# Altium PCB ADS1299-V3.PcbDoc (part 3 of 3)
Units mm, origin at the board's own origin, x right, y up, seen from the top; angles counter-clockwise.
Board outline 93.01 x 69.99 mm, 4 copper layers (Top, GND, POWER, Bottom), stack 0.603 mm thick; 198 components, 137 nets, 685 pads, 384 vias.
Unrouted connection lines stored in the file: 1.
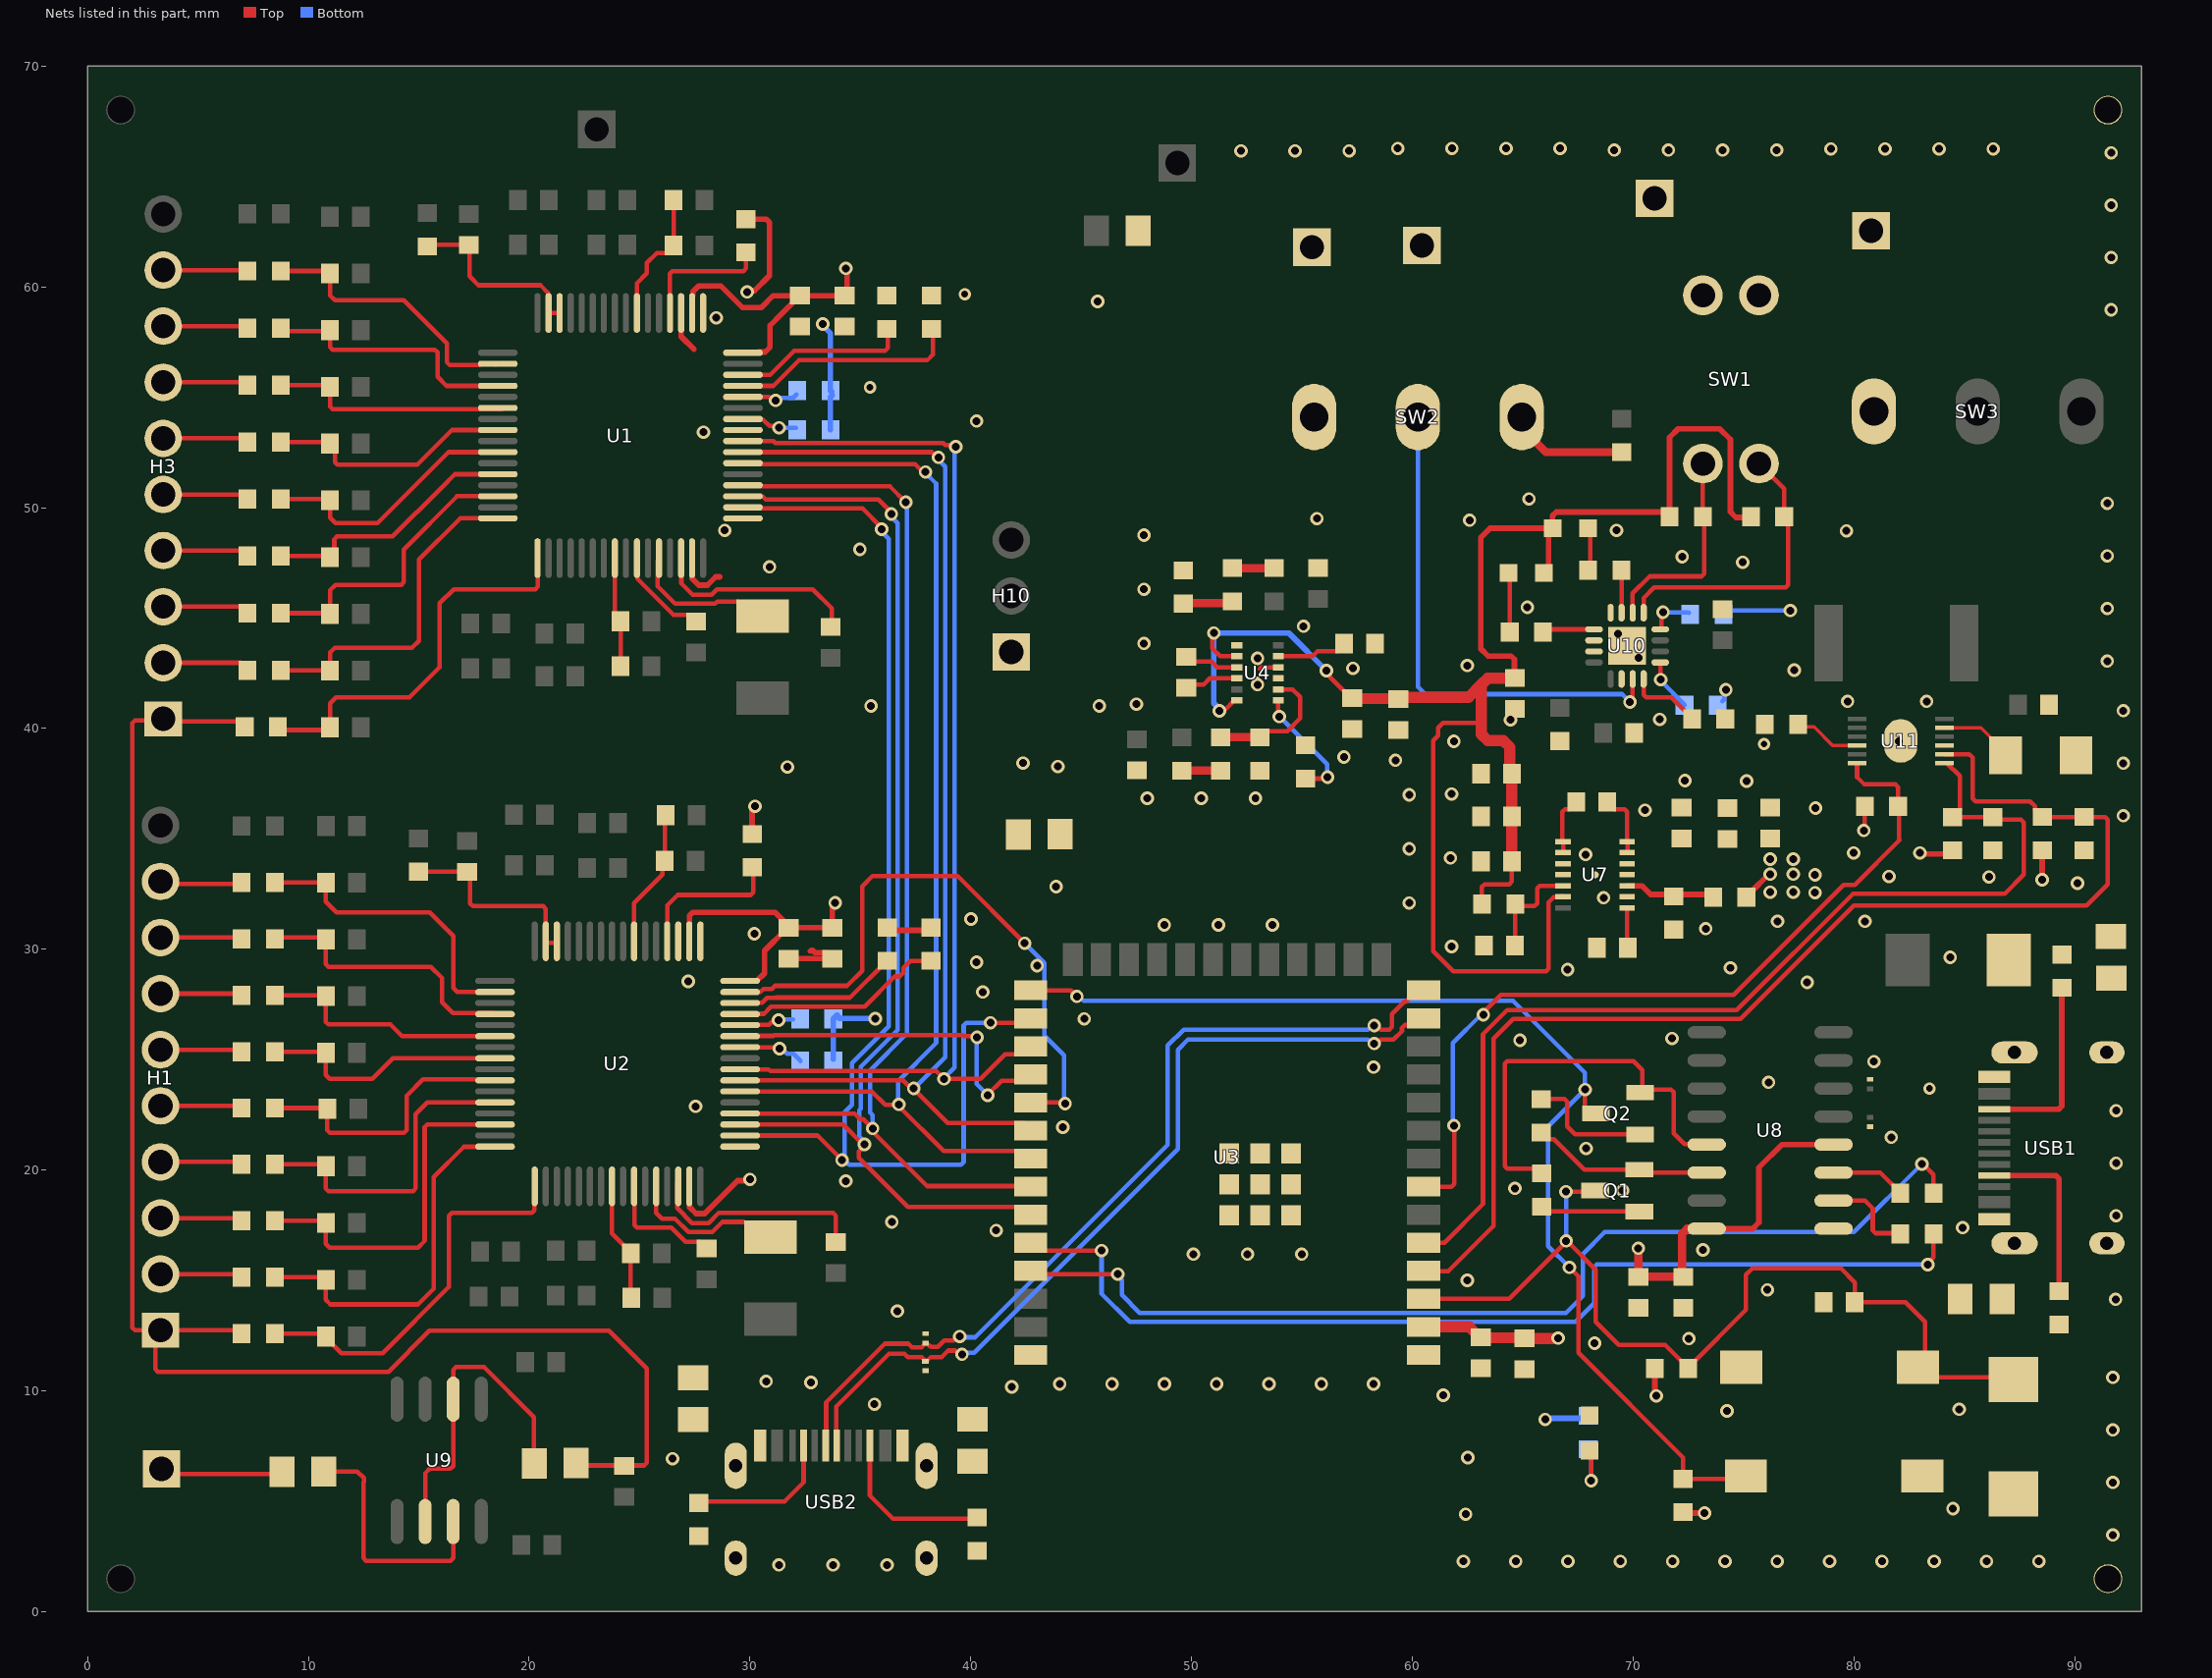
[diagram p4: the nets of this part, all layers, seen from the top]

## Via types
v1: diameter 0.61, hole 0.356, Top to Bottom, tented both sides, 357 vias
v2: diameter 0.61, hole 0.356, Top to Bottom, 22 vias
v3: diameter 0.559, hole 0.305, Top to Bottom, 4 vias
v4: diameter 1.016, hole 0.508, Top to Bottom, tented both sides, 1 vias

## Nets (pads, with @x,y where several pads share a name; then routed paths per layer and width w, separated by ;. In a path a pad name is that pad's centre, name@x,y a point inside that pad or via, vN(x,y) a via of type N, cw(c..) or ccw(c..) an arc to the next point about the centre after c; other vN are vias at no path point) (continued)
DGND: BOOT1.2 C14.2 C15.2 C66.2 C67.2 C73.2 C74.2 C75.1 C76.1 C77.2 C94.2 C95.2 D2.1 D3.1 D4.1 D6.1 D7.1 EN1.2 H10.1 LED1.1 pad.2@91.5,1.5 R3.2 R4.2 R5.2 R6.2 R8.1 R9.1 R10.2 R12.2 R13.2 R19.2 R57.2 R59.2 R60.1 R66.2 R67.2 R70.2 R71.2 U1.31 U1.33 U1.41 U1.49 U1.51 U2.31 U2.33 U2.49 U2.51 U3.1 U3.40 U3.41 U8.1 U11.3 U11.13 | length 27.5
  Top w0.254: U1.51@26.88,58.814 26.885,58.809 26.885,57.748 27.457,57.175 ; U2.31@27.253,19.266 27.258,19.261 27.258,18.336 27.558,18.036 27.948,18.036 29.437,19.525 29.939,19.525 v1(29.997,19.583) ; U1.31@27.38,47.714 27.385,47.709 27.385,46.784 27.685,46.484 28.075,46.484 28.454,46.863 28.626,46.863 ; R9.1@29.82,63.06 30.738,63.06 30.886,62.911 30.886,60.503 30.208,59.825 29.929,59.825 v1(29.87,59.766) ; C14.2@31.75,29.577 33.517,29.577 C15.2@33.604,29.489 ; 32.741,29.921 32.784,29.964 32.831,29.964 32.945,29.85 33.458,29.85 C15.2@33.731,29.577 ; R3.2@36.221,30.984 36.344,30.861 R4.2@38.1,30.861
  Bottom w0.254: v1@33.172,58.344 33.192,58.344 33.646,57.889 R13.2@33.646,55.296 R13.2@33.697,55.245 ; R19.2@33.646,53.518 33.646,55.008 R13.2@33.731,55.093 ; R6.2@33.773,25.028 R5.2@33.773,26.848 33.951,27.026 33.951,27.002 34.05,26.904 34.05,26.866 35.67,26.866 v1(35.678,26.858)
  other v1: 62.306,2.286 64.675,2.286 67.044,2.286 69.414,2.286 71.783,2.286 74.152,2.286 76.521,2.286 78.89,2.286 81.259,2.286 83.628,2.286 85.997,2.286 88.367,2.286 91.719,3.48 62.408,4.42 84.48,4.674 91.719,5.859 62.509,6.985 91.719,8.238 74.244,9.093 84.76,9.169 35.636,9.398 61.392,9.804 41.859,10.185 44.027,10.32 46.396,10.32 48.765,10.32 51.134,10.32 53.503,10.32 55.873,10.32 58.242,10.32 30.734,10.439 91.719,10.617 68.25,12.167 72.517,12.37 36.678,13.614 76.073,14.58 62.484,15.011 50.079,16.197 52.531,16.197 54.983,16.197 73.152,16.383 41.148,17.272 84.912,17.399 36.424,17.653 69.52,19.075 64.643,19.177 34.341,19.507 67.869,20.98 81.686,21.488 44.171,21.946 76.124,23.978 58.242,24.663 80.899,24.917 64.872,25.883 71.755,25.959 45.136,26.848 77.876,28.499 27.203,28.55 84.353,29.642 30.201,30.709 80.493,31.267 40.005,31.369 90.119,32.995 86.106,33.274 81.585,33.299 79.985,34.366 92.195,36.046 31.693,38.253 42.367,38.43 92.195,38.425 82.017,39.421 92.195,40.804 35.484,41.021 45.822,41.021 79.705,41.224 83.287,41.224 28.854,48.971 27.889,53.416 33.299,58.318 28.473,58.598 45.745,59.334
  other v2: 32.766,10.389 27.534,22.885 40.538,28.067 40.259,29.413 30.886,47.32 34.976,48.108 40.259,53.924
  other v3: 83.414,23.698 75.921,39.294 35.433,55.448 39.726,59.665
DRDY: U2.47 U3.31 | length 28.2
  Top w0.203: U2.47@29.553,28.066 29.568,28.08 30.482,28.08 30.613,28.211 30.989,28.211 31.124,28.346 34.392,28.346 35.077,29.032 35.077,32.842 35.56,33.325 39.395,33.325 v1(42.443,30.277) ; U3.31@42.709,23.062 44.222,23.062 v1(44.272,23.012)
  Bottom w0.203: v1(42.443,30.277) 43.332,29.388 43.332,26.086 44.221,25.197 44.221,23.063 v1(44.272,23.012)
  other v1: 43.002,29.261
DTR: Q2.2 R28.1 U8.13 | length 19.1
  Top w0.203: R28.1@65.862,19.854 65.65,20.066 64.305,20.066 64.186,20.185 64.186,24.824 64.305,24.943 70.002,24.943 70.409,24.536 Q2.2@70.409,23.368 ; Q2.2@70.46,23.622 70.485,23.647 71.712,23.647 71.831,23.528 71.831,21.666 72.327,21.171 73.315,21.171 U8.13@73.328,21.158
DVDD: C14.1 C15.1 C58.1 C59.1 C66.1 C67.1 C68.1 C73.1 C74.1 C75.2 C76.2 H8.1 R2.1 R16.2 R20.2 R30.1 R33.1 R55.1 R56.1 R58.1 U1.48 U1.50 U2.48 U2.50 U3.2 U7.4 U7.5 U8.4 U8.16 | length 57.2
  Top w0.203: v1@80.366,35.433 80.484,35.552 R58.1@80.484,36.474
  Top w0.254: U2.50@27.253,30.366 27.258,30.371 27.258,31.525 27.407,31.674 31.14,31.674 C14.1@31.521,31.293 ; U1.50@27.38,58.814 27.38,59.581 27.41,59.611 27.41,59.768 27.685,60.044 28.678,60.044 29.667,59.055 30.504,59.055 31.048,59.599 C66.1@32.258,59.599 34.022,59.599 C67.1@34.036,59.613 ; U2.48@29.553,28.566 30.306,28.566 30.658,28.918 30.658,29.935 C14.1@31.584,30.861 ; R2.1@30.099,35.221 30.099,36.346 v1@30.132,36.379 ; U1.48@30.389,57.047 30.689,57.047 30.912,57.271 30.912,58.253 31.414,58.755 31.414,58.762 31.645,58.992 31.652,58.992 31.999,59.339 31.999,59.389 C66.1@32.208,59.599 ; C14.1@31.75,30.977 C15.1@33.471,30.977 ; C15.1@33.731,30.977 33.731,32.004 v1@33.807,32.08 ; C67.1@34.281,59.599 34.392,59.709 v1@34.392,60.833 ; C76.2@70.18,15.218 C76.2@70.231,15.167 ; R33.1@70.976,11.024 70.976,9.872 v1@70.993,9.855 ; R30.1@72.263,4.513 72.306,4.47 v1(73.228,4.47) ; U8.16@73.076,17.399 73.127,17.348 U8.16@73.328,17.348 75.413,17.348 75.692,17.628 75.692,20.117 76.733,21.158 U8.4@79.072,21.158 ; R16.2@75.184,32.563 75.299,32.563 76.137,33.401 v1(76.2,33.401) ; v1@83.058,34.315 84.294,34.315 R56.1@84.455,34.476 ; v1(88.519,33.147) R55.1@88.519,34.485
  Top w0.381: C15.1@33.471,30.977 33.477,30.971 C15.1@33.477,30.963 ; C76.2@70.18,15.218 70.231,15.268 v1(70.231,16.459) ; C76.2@70.231,15.167 C75.2@72.263,15.167 ; C75.2@72.218,15.336 72.218,17.125 72.441,17.348 U8.16@73.076,17.348
  Top w0.508: U3.2@60.509,12.902 62.576,12.902 63.056,12.422 C73.1@63.106,12.422 ; C73.1@63.094,12.435 63.119,12.409 C74.1@65.075,12.409 ; C74.1@65.075,12.384 66.588,12.384 v1(66.599,12.395)
  Bottom w0.254: v1@66.116,8.763 67.868,8.763 R20.2@67.974,8.869
  other v1: 66.015,8.712 71.044,9.779 33.858,32.106 78.232,32.563 76.2,32.588 77.241,32.588 78.232,33.376 77.241,33.401 76.2,34.087 77.241,34.087 82.982,34.366 80.442,35.382 30.226,36.474 34.341,60.833
EEG1P: H1.2 R15.1 | length 3.7
  Top w0.203: H1.2@3.302,15.291 6.807,15.291 R15.1@6.96,15.138
EEG2P: H1.3 R18.1 | length 3.6
  Top w0.203: H1.3@3.302,17.831 6.756,17.831 R18.1@6.833,17.755
EEG3P: H1.4 R21.1 | length 3.6
  Top w0.203: H1.4@3.302,20.371 6.756,20.371 R21.1@6.858,20.269
EEG4P: H1.5 R22.1 | length 4.1
  Top w0.203: H1.5@3.302,22.911 6.833,22.911 R22.1@7.214,22.53
EEG5P: H1.6 R23.1 | length 3.7
  Top w0.203: H1.6@3.302,25.451 6.731,25.451 R23.1@6.909,25.273
EEG6P: H1.7 R24.1 | length 3.8
  Top w0.203: H1.7@3.302,27.991 6.909,27.991 R24.1@7.061,27.838
EEG7P: H1.8 R25.1 | length 3.8
  Top w0.203: H1.8@3.302,30.531 6.96,30.531 R25.1@7.061,30.429
EEG8P: H1.9 R34.1 | length 3.9
  Top w0.203: H1.9@3.302,33.071 3.404,32.969 6.68,32.969 7.036,33.325 R34.1@7.036,33.35
EEG9P: H3.2 R38.1 | length 4
  Top w0.203: H3.2@3.429,42.977 6.938,42.977 7.116,42.799 R38.1@7.315,42.799
EEG10P: H3.3 R39.1 | length 4
  Top w0.203: H3.3@3.429,45.517 7.214,45.517 R39.1@7.391,45.339
EEG11P: H3.4 R40.1 | length 3.9
  Top w0.203: H3.4@3.429,48.057 7.137,48.057 R40.1@7.29,47.904
EEG12P: H3.5 R41.1 | length 3.7
  Top w0.203: H3.5@3.429,50.597 6.946,50.597 7.036,50.507 R41.1@7.036,50.419
EEG13P: H3.6 R42.1 | length 3.8
  Top w0.203: H3.6@3.429,53.137 7.112,53.137 R42.1@7.214,53.035
EEG14P: H3.7 R43.1 | length 4.1
  Top w0.203: H3.7@3.429,55.677 7.087,55.677 R43.1@7.366,55.397
EEG15P: H3.8 R44.1 | length 4.1
  Top w0.203: H3.8@3.429,58.217 7.341,58.217 R44.1@7.468,58.09
EEG16P: H3.9 R45.1 | length 4.1
  Top w0.203: H3.9@3.429,60.757 7.315,60.757 R45.1@7.442,60.63
EN: C77.1 D4.2 EN1.1 Q1.3 R33.2 U3.3 | length 42
  Top w0.203: U3.3@60.509,14.172 64.388,14.172 66.963,16.748 v1(66.963,16.793) ; v1(66.954,19.025) 68.224,19.025 Q1.3@68.275,19.075 ; v1@67.005,16.789 68.301,15.494 68.301,13.132 69.342,12.09 71.445,12.09 72.334,11.201 R33.2@72.593,11.201 ; R33.2@72.483,11.024 72.483,11.052 72.613,11.182 75.108,13.677 75.108,15.265 75.387,15.545 79.408,15.545 80.043,14.911 C77.1@80.043,14.039 ; C77.1@80.024,14.021 82.321,14.021 83.21,13.132 83.21,10.998 EN1.1@83.185,10.973 ; EN1.1@82.892,11.074 83.35,10.617 D4.2@87.071,10.617
  Bottom w0.203: v1(66.954,19.025) 66.959,19.02 66.959,16.798 v1(66.963,16.793)
EN1: R47.2 SW1.4 U10.6 | length 9.7
  Top w0.203: U10.6@69.973,45.239 69.973,46.123 70.739,46.888 73.101,46.888 73.22,47.007 R47.2@73.22,49.497 ; R47.2@73.152,49.581 SW1.4@73.152,51.994 73.152,52.146 SW1.4@73.228,52.222
EN2: R46.2 SW1.3 U10.5 | length 13.6
  Top w0.203: U10.5@70.473,45.239 70.473,45.911 70.942,46.38 76.894,46.38 77.013,46.499 77.013,49.606 R46.2@76.937,49.682 ; SW1.3@75.641,51.968 75.717,51.968 76.835,50.851 R46.2@76.835,49.581
GND: C35.1 C37.2 C38.1 C39.1 C40.1 C55.2 C56.1 C57.1 C58.2 C59.2 C68.2 C79.1 C91.1 C92.1 C93.1 C97.1 H2.1 H5.1 pad.2@91.5,68 R8.2 R11.2 R48.1 R50.2 R51.2 R52.1 R62.1 R73.2 R74.1 R75.2 SW1.1 SW1.2 SW2.3 U4.4 U4.13 U7.2 U7.15 U10.8 U10.14 U10.17 | length 4.6
  Top w0.203: 53.086,42.697 53.158,42.77 U4.4@53.924,42.77
  Bottom w0.203: R50.2@74.041,41.224 74.131,41.314 74.131,41.695 v1(74.193,41.758) ; R51.2@74.083,45.161 74.261,45.339 77.064,45.339 v1@77.089,45.314
  other v1: 67.031,29.083 74.397,29.159 61.773,30.124 73.279,30.937 48.759,31.107 51.21,31.107 53.662,31.107 76.53,31.267 59.851,32.096 68.656,32.334 43.866,32.842 61.722,34.138 67.843,34.29 59.851,34.548 70.536,36.297 78.257,36.398 47.989,36.838 50.44,36.838 52.892,36.838 59.851,37 61.773,37.033 72.339,37.643 43.942,38.278 61.874,39.421 64.44,40.386 71.196,40.411 47.498,41.097 52.984,41.986 77.292,42.647 57.302,42.723 62.484,42.85 91.465,43.053 52.984,43.18 70.238,43.187 47.845,43.848 69.317,44.298 55.067,44.628 77.114,45.339 91.465,45.432 65.202,45.491 47.845,46.3 74.955,47.523 72.212,47.777 91.465,47.811 47.845,48.752 79.654,48.946 69.24,48.971 62.586,49.428 55.677,49.505 91.465,50.19 65.278,50.394 91.643,58.958 91.643,61.327 91.643,63.696 91.643,66.065 52.233,66.152 54.685,66.152 57.136,66.152 69.142,66.192 71.594,66.192 74.045,66.192 76.497,66.192 78.949,66.243 81.401,66.243 83.853,66.243 86.305,66.243 59.334,66.269 61.786,66.269 64.238,66.269 66.69,66.269
  other v2: 75.133,37.617 59.233,38.557 56.896,38.71
GPIO0: BOOT1.1 Q2.3 R30.2 U3.27 | length 51.9
  Top w0.203: U3.27@42.709,28.142 44.527,28.142 v1@44.729,27.94 ; v1(67.107,15.596) 67.513,15.189 67.513,11.735 72.263,6.985 R30.2@72.263,6.02 74.524,6.02 BOOT1.1@74.752,6.248 ; v1(67.818,23.647) 67.818,22.814 68,22.631 Q2.3@68.021,22.631
  Bottom w0.203: v1(44.806,27.864) 44.916,27.864 45.119,27.661 64.567,27.661 67.818,24.409 67.818,23.551 67.722,23.551 66.142,21.971 66.142,16.561 v1(67.107,15.596)
GPIOT: R58.2 U3.7 U11.12 | length 36.9
  Top w0.203: U3.7@60.509,19.252 61.772,19.252 61.891,19.371 61.891,21.911 v1@61.976,21.996 ; v1(63.209,27.038) 63.209,27.141 64.008,27.94 74.552,27.94 79.526,32.914 80.031,32.914 82.067,34.95 ; U11.12@80.137,38.437 80.137,37.795 80.467,37.465 81.872,37.465 81.991,37.346 R58.2@81.991,36.474 82.042,36.424 82.042,34.976
  Bottom w0.203: v1@61.824,22.149 61.824,25.756 63.106,27.038 v1(63.209,27.038)
  other v1: 61.874,22.022
IN1P: C24.1 R15.2 U2.16 | length 17
  Top w0.203: R15.2@8.489,15.15 10.631,15.15 C24.1@10.643,15.138 ; C24.1@10.792,15.037 10.792,14.125 10.998,13.919 14.961,13.919 15.672,14.63 15.672,19.685 17.043,21.057 18.694,21.057 U2.16@18.72,21.082
IN2P: C25.1 R18.2 U2.14 | length 16.3
  Top w0.203: R18.2@8.489,17.704 C25.1@10.744,17.704 ; C25.1@10.792,17.605 10.792,16.665 10.973,16.485 14.961,16.485 15.265,16.789 15.265,21.947 15.384,22.066 U2.14@18.453,22.066
IN3P: C26.1 R21.2 U2.12 | length 14.5
  Top w0.203: R21.2@8.489,20.258 10.403,20.258 C26.1@10.58,20.435 ; C26.1@10.792,20.173 10.792,19.169 10.911,19.05 14.74,19.05 14.859,19.169 14.859,22.538 15.387,23.066 U2.12@18.453,23.066
IN4P: C27.1 R22.2 U2.10 | length 12.8
  Top w0.203: R22.2@8.489,22.812 10.691,22.812 C27.1@10.719,22.784 ; C27.1@10.857,22.784 10.857,21.811 10.976,21.692 14.334,21.692 14.453,21.811 14.453,23.368 15.189,24.105 U2.10@18.517,24.105
IN5P: C30.1 R23.2 U2.8 | length 11.2
  Top w0.203: R23.2@8.489,25.366 10.549,25.366 C30.1@10.668,25.248 ; C30.1@10.792,25.31 10.792,24.311 10.973,24.13 12.903,24.13 13.839,25.066 U2.8@18.343,25.066
IN6P: C31.1 R24.2 U2.6 | length 11.4
  Top w0.203: R24.2@8.489,27.92 C31.1@10.792,27.92 ; C31.1@10.792,27.878 10.792,26.713 10.911,26.594 13.716,26.594 14.244,26.066 U2.6@18.453,26.066
IN7P: C32.1 R25.2 U2.4 | length 12.3
  Top w0.203: R25.2@8.489,30.474 8.545,30.531 C32.1@10.439,30.531 ; C32.1@10.792,30.446 10.792,29.329 10.911,29.21 15.545,29.21 16.053,28.702 16.053,27.61 16.542,27.121 U2.4@18.44,27.121
IN8P: C33.1 R34.2 U2.2 | length 14
  Top w0.203: R34.2@8.489,33.029 10.651,33.029 C33.1@10.715,33.092 ; C33.1@10.795,33.122 10.795,32.156 11.278,31.674 15.494,31.674 16.561,30.607 16.561,28.245 16.74,28.066 U2.2@18.453,28.066
IN9P: C83.1 R38.2 U1.16 | length 15.2
  Top w0.203: R38.2@8.754,42.638 C83.1@10.837,42.638 ; C83.1@10.984,42.624 10.984,43.445 11.201,43.663 14.707,43.663 15.011,43.967 15.011,47.65 16.875,49.514 U1.16@18.58,49.514
IN10P: C84.1 R39.2 U1.14 | length 13.4
  Top w0.203: R39.2@8.754,45.22 C84.1@10.905,45.22 ; C84.1@10.984,45.192 10.984,46.264 11.227,46.507 14.207,46.507 14.326,46.626 14.326,48.108 16.732,50.514 U1.14@18.51,50.514
IN11P: C85.1 R40.2 U1.12 | length 11.7
  Top w0.203: R40.2@8.754,47.803 C85.1@10.947,47.803 ; C85.1@10.984,47.76 11.176,47.953 11.176,48.573 11.295,48.692 13.818,48.692 16.027,50.902 16.64,51.514 U1.12@18.58,51.514
IN12P: C86.1 R41.2 U1.10 | length 12
  Top w0.203: R41.2@8.754,50.385 C86.1@10.964,50.385 ; C86.1@10.984,50.329 10.984,49.541 11.224,49.301 13.132,49.301 16.344,52.514 U1.10@18.58,52.514
IN13P: C87.1 R42.2 U1.8 | length 11.2
  Top w0.203: R42.2@8.754,52.967 C87.1@10.88,52.967 ; C87.1@10.984,52.897 11.201,52.679 11.201,52.062 11.32,51.943 14.935,51.943 16.506,53.514 U1.8@18.58,53.514 18.622,53.514 U1.8@18.644,53.492
IN14P: C88.1 R43.2 U1.6 | length 10.9
  Top w0.203: R43.2@8.754,55.55 C88.1@10.897,55.55 ; C88.1@10.984,55.465 10.984,54.578 11.103,54.459 U1.6@18.771,54.459
IN15P: C89.1 R44.2 U1.4 | length 11.7
  Top w0.203: R44.2@8.754,58.132 8.898,57.988 C89.1@10.947,57.988 ; C89.1@10.984,58.033 10.984,57.269 11.103,57.15 15.731,57.15 15.85,57.031 15.85,55.923 16.259,55.514 18.303,55.514 U1.4@18.313,55.524
IN16P: C90.1 R45.2 U1.2 | length 12.5
  Top w0.203: R45.2@8.754,60.714 C90.1@10.964,60.714 ; C90.1@10.984,60.602 10.984,59.603 11.201,59.385 14.326,59.385 16.281,57.429 16.281,56.583 16.4,56.464 17.75,56.464 17.785,56.499 18.47,56.499 U1.2@18.491,56.478
NetC1_2: C1.2 R7.2 U1.62 U1.63 | length 8.4
  Top w0.203: R7.2@15.545,61.874 15.567,61.897 C1.2@17.272,61.897 ; C1.2@17.196,61.798 17.297,61.697 17.297,60.477 17.704,60.071 20.512,60.071 20.865,59.717 20.865,58.828 U1.63@20.88,58.814 ; U1.63@20.892,58.814 U1.62@21.38,58.814
NetC3_2: C3.2 R1.2 U2.62 U2.63 | length 9.4
  Top w0.203: R1.2@14.884,33.452 14.946,33.514 C3.2@17.194,33.514 ; C3.2@17.113,33.433 17.331,33.215 17.331,32.072 17.45,31.953 20.634,31.953 20.753,31.834 U2.63@20.753,30.366 20.753,30.338 20.789,30.302 U2.62@21.285,30.302
NetC10_1: C10.1 C11.1 U2.55 | length 6.2
  Top w0.203: U2.55@24.753,30.366 24.753,32.094 26.034,33.375 26.034,33.73 C10.1@26.103,33.799 ; C10.1@26.148,34.011 26.148,36.105 C11.1@26.213,36.17
NetC16_2: C16.2 C78.2 U2.24 | length 5.4
  Top w0.203: U2.24@23.753,19.266 23.753,17.126 24.598,16.281 24.598,14.249 C78.2@24.624,14.224 ; U2.24@23.753,19.435 U2.24@23.774,19.456
NetC17_2: C17.2 C69.2 U1.24 | length 5
  Top w0.203: U1.24@23.88,47.714 23.88,44.929 C69.2@23.952,44.856 ; C69.2@24.079,44.882 24.141,44.82 C17.2@24.141,42.824
NetC18_2: C18.2 U2.26 | length 5.5
  Top w0.203: U2.26@24.765,19.253 24.768,19.25 24.768,17.515 24.887,17.396 26.437,17.396 27.087,16.746 27.743,16.746 C18.2@28.042,16.448
NetC19_1: C19.1 U2.28 | length 7.3
  Top w0.203: U2.28@25.756,19.329 25.756,18.059 26.012,17.803 26.606,17.803 27.211,17.198 28.295,17.198 28.752,17.655 29.732,17.655 29.761,17.625 30.286,17.625 C19.1@30.937,16.974
NetC20_2: C20.2 U2.30 | length 10.1
  Top w0.203: U2.30@26.698,19.482 26.698,18.286 27.379,17.604 28.127,17.604 28.584,18.061 33.765,18.061 33.884,17.942 C20.2@33.884,16.739
NetC36_1: C36.1 U4.9 | length 2.5
  Top w0.203: C36.1@49.733,43.307 50.013,43.028 50.902,43.028 51.16,42.77 U4.9@52.045,42.77
NetC36_2: C36.2 U4.10 | length 2.4
  Top w0.203: C36.2@49.886,41.758 49.886,41.765 50.107,41.986 50.546,41.986 50.829,42.27 U4.10@52.045,42.27
NetC40_2: C40.2 U4.5 | length 3.2
  Top w0.203: U4.5@53.924,43.27 55.481,43.27 55.704,43.492 56.609,43.492 56.907,43.79 C40.2@56.907,43.84
NetC62_1: C62.1 C63.1 U1.55 | length 6
  Top w0.203: U1.55@24.88,58.814 24.88,60.161 25.331,60.612 25.331,61.075 25.782,61.526 26.239,61.526 C62.1@26.529,61.816 ; C62.1@26.529,61.874 26.543,61.889 C63.1@26.543,63.932
NetC70_2: C70.2 U1.26 | length 4.4
  Top w0.203: U1.26@24.88,47.714 24.895,47.699 24.895,46.784 26.535,45.144 27.211,45.144 27.356,44.998 C70.2@27.356,44.755
NetC71_1: C71.1 U1.28 | length 6.6
  Top w0.203: U1.28@25.825,47.6 25.825,46.429 26.608,45.646 28.422,45.646 28.519,45.743 29.495,45.743 30.147,45.091 C71.1@30.582,45.091
NetC72_2: C72.2 U1.30 | length 9.5
  Top w0.203: U1.30@26.88,47.714 26.895,47.699 26.895,46.562 27.405,46.052 28.254,46.052 28.506,46.304 32.842,46.304 33.706,45.441 33.706,44.577 C72.2@33.68,44.552
NetC79_2: C79.2 R14.2 U7.12 | length 4.7
  Top w0.203: R14.2@64.613,31.983 64.643,31.953 R14.2@64.66,31.953 ; C79.2@64.643,30.277 64.66,30.294 R14.2@64.66,31.953 ; R14.2@64.66,32.029 R14.2@64.66,32.055 ; U7.12@66.825,32.876 65.764,32.876 65.645,32.757 65.645,32.072 65.526,31.953 R14.2@64.66,31.953
NetC94_1: C94.1 U11.5 | length 3.6
  Top w0.152: U11.5@84.087,40.037 85.744,40.037 86.202,39.579 86.202,39.574 87.091,38.684 C94.1@87.097,38.684
NetC97_2: C97.2 U7.1 | length 1.9
  Top w0.203: U7.1@69.725,31.875 69.725,30.122 C97.2@69.799,30.048
NetH4_1: H4.1 SW3.1
NetL1_1: L1.1 U7.8 U7.9 | length 2.7
  Top w0.203: U7.9@66.825,34.376 U7.8@66.825,34.847 ; U7.8@66.825,34.852 66.825,34.862 66.788,34.899 66.788,36.228 66.907,36.347 67.124,36.347 67.423,36.646 L1.1@67.423,36.678
NetL1_2: L1.2 U7.6 U7.7 | length 3
  Top w0.203: L1.2@68.823,36.678 68.823,36.646 69.121,36.347 69.606,36.347 69.725,36.228 U7.7@69.725,34.876 69.727,34.876 69.75,34.852 69.75,34.399 69.749,34.399 U7.6@69.725,34.376
NetLED1_2: LED1.2 R20.1 | length 2.9
  Top w0.203: LED1.2@68.025,7.303 68.097,7.23 v1(68.097,5.944)
  Bottom w0.203: R20.1@68.047,7.417 68.097,7.366 v1(68.097,5.944)
NetLED2_1: LED2.1 R53.2 | length 1.9
  Top w0.203: R53.2@67.954,47.168 68.047,47.261 LED2.1@68.047,49.047
NetLED3_1: LED3.1 R54.2 | length 2.7
  Top w0.203: LED3.1@64.237,47.041 64.406,46.871 R54.2@64.406,44.374
NetQ1_1: Q1.1 R28.2 | length 4.4
  Top w0.203: R28.2@66.04,18.39 66.04,18.278 66.193,18.125 Q1.1@70.275,18.125
NetQ2_1: Q2.1 R29.2 | length 6
  Top w0.203: R29.2@65.634,23.114 65.735,23.216 66.886,23.216 67.005,23.097 67.005,21.971 67.361,21.615 Q2.1@70.307,21.615
NetR2_2: R2.2 U2.52 | length 7.2
  Top w0.203: U2.52@26.253,30.366 26.253,31.993 26.721,32.461 30.031,32.461 30.15,32.58 R2.2@30.15,34.036
NetR3_1: R3.1 U2.46 | length 7.5
  Top w0.203: U2.46@29.553,27.566 29.568,27.581 30.557,27.581 30.781,27.805 31.157,27.805 31.166,27.813 34.528,27.813 36.192,29.478 R3.1@36.221,29.478
NetR4_1: R4.1 U2.45 | length 9.5
  Top w0.203: U2.45@29.779,27.066 29.794,27.08 30.631,27.08 30.949,27.398 31.326,27.398 31.334,27.407 35.196,27.407 36.559,28.77 36.779,28.77 36.958,28.948 36.958,29.168 37.267,29.478 R4.1@38.202,29.478
NetR5_1: R5.1 U2.44 | length 2.5
  Top w0.203: U2.44@29.553,26.566 29.568,26.581 30.521,26.581 30.526,26.585 30.866,26.585 30.992,26.711 31.215,26.711 v1(31.293,26.789)
  Bottom w0.203: v1(31.293,26.789) 31.327,26.822 R5.1@31.953,26.822
NetR6_1: R6.1 U2.42 | length 3
  Top w0.203: U2.42@29.553,25.566 29.568,25.551 31.294,25.551 v1(31.344,25.502)
  Bottom w0.203: v1(31.344,25.502) 31.454,25.502 31.682,25.273 31.965,25.273 32.283,24.955 R6.1@32.283,24.943
NetR9_2: R9.2 U1.52 | length 5.9
  Top w0.203: U1.52@26.391,59.004 26.365,59.03 26.365,59.825 26.365,60.591 26.484,60.71 29.701,60.71 29.82,60.829 R9.2@29.82,61.553
NetR10_1: R10.1 U1.46 | length 7.9
  Top w0.203: U1.46@29.68,56.014 30.919,56.014 32.004,57.099 36.119,57.099 36.246,57.226 36.246,57.963 R10.1@36.297,58.014
NetR12_1: R12.1 U1.45 | length 10.5
  Top w0.203: U1.45@29.68,55.514 31.054,55.514 32.212,56.672 38.029,56.672 38.278,56.921 38.278,57.912 R12.1@38.506,58.141
NetR13_1: R13.1 U1.44 | length 2.2
  Top w0.203: U1.44@29.68,55.014 30.869,55.014
  Bottom w0.203: v1(31.158,54.857) 31.268,54.857 31.377,54.965 31.953,54.965 R13.1@32.106,55.118
NetR16_1: R16.1 R62.2 U7.3 | length 3.8
  Top w0.254: U7.3@69.725,32.876 70.401,32.876 70.79,32.487 R62.2@71.78,32.487 ; R62.2@71.831,32.402 71.916,32.487 R16.1@73.355,32.487
NetR19_1: R19.1 U1.42 | length 2.6
  Top w0.203: U1.42@29.68,54.014 29.695,53.999 30.579,53.999 30.62,53.959 30.624,53.959 30.886,53.697 31.24,53.697 v1(31.318,53.619)
  Bottom w0.203: v1(31.318,53.619) R19.1@32.08,53.619
NetR26_1: R26.1 U8.3 | length 3.6
  Top w0.203: U8.3@79.072,19.888 81.182,19.888 82.118,18.952 R26.1@82.118,18.745
NetR27_1: R27.1 U8.2 | length 4.1
  Top w0.203: U8.2@79.072,18.618 80.493,18.618 80.848,18.263 80.848,17.264 80.967,17.145 81.864,17.145 R27.1@81.94,17.069
NetR31_1: R31.1 USB1.A5 | length 8.1
  Top w0.254: USB1.A5@86.353,19.756 89.132,19.756 89.281,19.607 R31.1@89.281,14.52
NetR32_1: R32.1 USB1.B5 | length 8.5
  Top w0.254: USB1.B5@86.353,22.756 89.259,22.756 89.408,22.905 R32.1@89.408,28.253
NetR36_1: R36.1 U9.3 | length 11.4
  Top w0.203: R36.1@10.703,6.35 12.217,6.35 12.514,6.053 12.514,5.885 12.497,5.867 12.497,2.43 12.616,2.311 16.442,2.311 16.561,2.43 U9.3@16.561,4.086
NetR37_2: R37.2 U9.2 U9.6 | length 14.8
  Top w0.203: U9.2@15.291,4.086 15.291,6.274 15.494,6.477 16.442,6.477 16.561,6.596 16.561,10.958 16.68,11.077 17.96,11.077 20.218,8.818 R37.2@20.218,6.629
NetR48_2: R48.2 U10.16 | length 3.3
  Top w0.203: U10.16@70.473,42.239 70.473,41.521 70.592,41.402 71.725,41.402 72.593,40.534 R48.2@72.593,40.488
NetR49_2: R49.2 SW2.1 | length 5.5
  Top w0.356: SW2.1@64.999,54.127 64.999,53.552 66.04,52.51 R49.2@69.469,52.51
NetR50_1: R50.1 U10.1 | length 2.4
  Top w0.203: U10.1@71.223,42.989 71.235,42.977 71.235,42.227 v1(71.247,42.215)
  Bottom w0.203: v1(71.247,42.215) 71.247,42.151 72.322,41.075 R50.1@72.322,41.046
NetR51_1: R51.1 U10.4 | length 2
  Top w0.203: U10.4@71.223,44.489 71.25,44.489 71.286,44.524 71.286,45.2 v1(71.349,45.263)
  Bottom w0.203: v1(71.349,45.263) 72.492,45.263 R51.1@72.517,45.237
NetR53_1: R53.1 U10.7 | length 2
  Top w0.203: R53.1@69.393,47.168 69.473,47.087 U10.7@69.473,45.239
NetR54_1: R54.1 U10.9 | length 2.4
  Top w0.203: R54.1@65.913,44.374 66.028,44.489 U10.9@68.223,44.489
NetR60_2: R60.2 U11.10 | length 3.2
  Top w0.152: R60.2@77.318,40.259 77.508,40.069 78.194,40.069 79.025,39.237 U11.10@80.137,39.237
NetR63_1: R63.1 R72.2 | length 1.8
  Top w0.381: R63.1@49.555,38.092 51.291,38.092 R72.2@51.359,38.024
NetR68_1: R68.1 USB2.A5 | length 6.7
  Top w0.203: R68.1@27.762,5.004 31.572,5.004 32.43,5.862 USB2.A5@32.43,7.525
NetR69_1: R69.1 USB2.B5 | length 7.5
  Top w0.203: USB2.B5@35.43,7.526 35.43,5.26 36.474,4.216 R69.1@40.259,4.216
NetR72_1: R72.1 R74.2 U4.2 | length 6
  Top w0.203: R74.2@53.061,39.573 R74.2@53.086,39.599 53.365,39.878 54.331,39.878 54.915,40.462 54.915,41.427 54.573,41.77 U4.2@53.924,41.77
  Top w0.381: R72.1@51.321,39.599 R74.2@52.984,39.599
NetR73_1: R73.1 U4.1 | length 5.4
  Top w0.203: U4.1@53.924,41.27 53.924,40.615 v1@53.95,40.589 ; R73.1@55.169,37.728 56.143,37.728 v1@56.185,37.77
  Bottom w0.203: v1(53.975,40.538) 56.134,38.379 56.134,37.744 v1@56.109,37.719
  other v1: 56.159,37.795
NetR75_1: R75.1 R76.2 U4.7 | length 2.3
  Top w0.381: R75.1@49.632,45.652 49.657,45.678 51.765,45.678 R76.2@51.841,45.754
NetR76_1: R76.1 R77.2 | length 1.8
  Top w0.381: R76.1@51.841,47.261 53.653,47.261 R77.2@53.679,47.235
NetSW2_2: SW2.2 U10.15 | length 24
  Top w0.203: U10.15@69.973,42.239 69.973,41.33 v1@70.053,41.25
  Bottom w0.203: SW2.2@60.528,54.839 60.249,54.559 SW2.2@60.249,54.102 60.249,41.885 60.579,41.554 69.494,41.554 v1(69.85,41.199)
OUT: C38.2 C39.2 C55.1 C56.2 C57.2 C93.2 LED2.2 LED3.2 R14.1 R46.1 R47.1 U4.3 U4.8 U4.12 U7.10 U7.11 U7.13 U10.10 U10.11 | length 85.3
  Top w0.203: v1(51.003,44.323) 50.935,44.255 50.935,43.849 50.927,43.84 50.927,43.637 51.295,43.27 U4.8@52.045,43.27 ; v1@51.525,40.86 51.934,41.27 U4.12@52.045,41.27 ; v1(56.109,42.621) 56.109,42.511 56.268,42.352 56.268,42.325 57.227,41.365 C38.2@57.277,41.365 ; 63.119,40.259 61.392,40.259 61.163,40.03 61.163,39.675 60.935,39.446 60.935,29.921 61.849,29.007 66.051,29.007 66.17,29.126 66.17,32.127 66.396,32.352 66.73,32.352 U7.13@66.777,32.399 ; R14.1@63.144,31.979 63.144,32.825 63.263,32.944 64.386,32.944 64.505,33.063 C57.2@64.505,33.985
  Top w0.254: C93.2@64.618,42.28 64.618,43.129 64.465,43.282 63.424,43.282 63.094,43.612 63.094,48.641 63.519,49.066 LED2.2@66.346,49.066 ; LED3.2@65.989,47.083 66.167,47.261 66.167,48.887 LED2.2@66.346,49.066 ; R47.1@71.526,49.759 71.482,49.803 66.514,49.803 66.346,49.635 LED2.2@66.346,49.066 ; R47.1@71.645,49.581 71.645,49.759 71.645,53.179 72.034,53.569 73.914,53.569 74.397,53.086 74.397,49.809 74.651,49.555 R46.1@75.362,49.555
  Top w0.508: C38.2@57.277,41.365 57.29,41.353 59.347,41.353 C39.2@59.36,41.34 59.436,41.416 62.553,41.416 63.119,41.982 ; C56.2@64.414,37.998 64.414,39.149 64.117,39.446 63.417,39.446 63.119,39.744 63.119,40.259 63.119,41.982 ; C57.2@64.505,34.047 C55.1@64.505,36.017 C56.2@64.505,37.948 ; C93.2@64.618,42.28 63.417,42.28 63.119,41.982
  Bottom w0.254: v1@51.283,40.863 51.003,41.143 v1(51.003,44.323) 54.407,44.323 v1(56.109,42.621)
  other v1: 51.257,40.792
PGND1: R68.2 R69.2 R70.1 R71.1 USB2.13 USB2.14 USB2.15 USB2.16 USB2.A1B12 USB2.B1A12
  other v1: 31.309,2.125 33.761,2.125 36.212,2.125
  other v2: 26.492,6.934
PGND2: D1.1 R31.2 R32.2 R66.1 R67.1 USB1.13 USB1.14 USB1.15 USB1.16 USB1.A1B12 USB1.B1A12
  other v1: 91.846,14.148 91.864,17.935 91.864,20.315 91.864,22.694
PWDR: U1.35 U2.35 U3.35 | length 52.5
  Top w0.203: U2.35@29.553,22.066 34.218,22.066 v1@35.182,21.102 ; U1.35@29.68,50.514 29.695,50.499 30.584,50.499 30.718,50.365 35.817,50.365 36.398,49.784 v1(36.398,49.708) ; v1(35.182,21.167) v1@35.182,21.102 ; U3.35@43.028,17.907 42.604,18.331 37.156,18.331 34.925,20.562 34.925,20.844 v1@35.182,21.102
  Bottom w0.203: v1(35.182,21.167) 35.182,21.277 34.947,21.512 34.947,22.709 35.027,22.788 35.027,24.679 36.694,26.346 36.694,49.302 36.398,49.598 v1(36.398,49.708)
REF: C81.2 H1.1 H3.1 R17.2 R37.1 R64.2 | length 70.7
  Top w0.203: H3.1@3.416,40.45 3.327,40.361 2.151,40.361 2.032,40.242 2.032,12.87 2.151,12.751 H1.1@3.073,12.751 ; H3.1@3.429,40.437 3.556,40.31 R64.2@7.01,40.31 ; R17.2@7.01,12.573 6.833,12.751 H1.1@3.302,12.751 H1.1@3.073,12.751 ; R37.1@22.133,6.731 22.234,6.629 24.308,6.629 25.205,6.629 25.324,6.748 25.324,11.024 23.622,12.725 15.481,12.725 13.627,10.871 3.192,10.871 3.073,10.99 H1.1@3.073,12.751
RESET: U1.36 U2.36 U3.34 | length 51.7
  Top w0.203: U2.36@29.553,22.566 34.737,22.566 34.983,22.32 35.125,22.32 v1(35.557,21.888) ; U1.36@29.68,51.014 30.461,51.014 30.516,50.959 36.341,50.959 v1(37.059,50.241) ; v1@35.486,21.817 35.535,21.768 38.024,19.279 U3.34@43.002,19.279
  Bottom w0.203: v1(35.557,21.888) 35.546,21.899 35.546,22.497 35.433,22.61 35.433,24.511 37.1,26.178 37.1,50.2 v1(37.059,50.241)
RTS: Q1.2 R29.1 U8.14 | length 8
  Top w0.203: R29.1@66.04,21.59 66.04,21.533 66.167,21.406 66.402,21.406 67.783,20.025 Q1.2@70.275,20.025 ; Q1.2@70.275,19.888 U8.14@73.328,19.888
RXD0: R27.2 U3.36 | length 46.5
  Top w0.203: U3.36@42.901,16.434 42.971,16.364 45.917,16.364 v1(45.923,16.358) ; v1@83.261,15.799 83.363,15.799 83.6,16.036 R27.2@83.6,17.12
  Bottom w0.203: v1(45.923,16.358) 45.923,14.402 47.193,13.132 67.386,13.132 68.224,13.97 68.224,15.604 68.343,15.723 v1(83.337,15.723)
SCL: R55.2 R59.1 U3.4 U11.2 | length 55.9
  Top w0.203: U3.4@60.452,15.418 61.62,15.418 63.678,17.475 63.678,25.959 64.567,26.848 74.854,26.848 79.985,31.979 90.526,31.979 91.491,32.944 91.491,35.873 91.372,35.992 R59.1@90.424,35.992 ; U11.2@84.087,38.837 85.217,38.837 85.369,38.684 85.369,36.83 85.508,36.691 87.98,36.691 88.189,36.482 88.189,36.293 88.439,36.043 R55.2@88.544,36.043 ; R55.2@88.519,35.992 R59.1@90.297,35.992
SDA: R56.2 R57.1 U3.5 U11.1 | length 46.7
  Top w0.203: U3.5@60.81,16.713 60.811,16.715 61.444,16.715 63.195,18.466 63.195,26.162 64.287,27.254 74.685,27.254 79.939,32.508 86.813,32.508 87.681,33.376 87.681,35.746 87.562,35.865 86.394,35.865 R57.1@86.275,35.983 ; U11.1@84.201,38.43 84.785,37.846 84.785,36.285 84.484,35.983 R56.2@84.455,35.983 R57.1@86.199,35.983
SPI_CLK: U1.40 U2.40 U3.29 | length 52.3
  Top w0.203: U2.40@29.553,24.566 30.842,24.566 30.923,24.486 38.43,24.486 v1(38.786,24.13) 40.437,24.13 41.561,25.254 42.323,25.254 U3.29@42.647,25.578 ; U1.40@29.68,53.014 31.062,53.014 31.155,52.92 38.747,52.92 38.834,52.834 39.191,52.834 v1@39.218,52.807
  Bottom w0.203: v1(38.786,24.13) 38.786,24.171 39.268,24.653 39.268,52.705 v1(39.319,52.756)
SPI_CS: U1.39 U2.39 U3.32 | length 52.5
  Top w0.203: U2.39@29.553,24.066 36.937,24.066 37.304,23.698 v1(37.414,23.698) 37.414,23.673 38.946,22.141 42.426,22.141 U3.32@42.85,21.717 ; U1.39@29.68,52.514 38.235,52.514 38.476,52.273 v1(38.532,52.273)
  Bottom w0.203: v1(37.414,23.698) 38.837,25.121 38.837,51.858 38.532,52.163 v1(38.532,52.273)
SPI_MISO: U2.43 U3.30 | length 15.6
  Top w0.203: U2.43@29.553,26.066 29.568,26.08 31.06,26.08 31.091,26.111 39.641,26.111 39.675,26.077 40.217,26.077 v1(40.284,26.01) ; v1(40.767,23.393) 40.767,23.424 41.397,24.054 42.131,24.054 U3.30@42.342,24.265
  Bottom w0.203: v1(40.284,26.01) 40.259,25.984 40.259,23.901 v1(40.767,23.393)
SPI_MOSI: U1.34 U2.34 U3.28 | length 56.4
  Top w0.203: U2.34@29.553,21.566 33.059,21.566 v1(34.17,20.454) ; U1.34@29.68,50.014 30.461,50.014 30.516,49.959 35.106,49.959 35.96,49.105 v1(35.96,49.023) ; v1(40.894,26.67) 42.342,26.67 U3.28@42.621,26.949
  Bottom w0.203: v1(35.96,49.023) 35.96,48.913 36.287,48.586 36.287,26.515 34.62,24.848 34.62,22.956 34.29,22.626 34.29,20.625 34.315,20.599 34.225,20.509 v1(34.17,20.454) 34.28,20.454 34.491,20.244 39.556,20.244 39.675,20.363 39.675,26.551 39.794,26.67 v1(40.894,26.67)
SRB: C23.2 R17.1 U2.17 | length 18
  Top w0.203: R17.1@8.489,12.596 C23.2@10.792,12.596 ; C23.2@10.792,12.469 10.792,12.419 11.497,11.714 13.371,11.714 16.375,14.718 16.375,17.94 16.494,18.059 20.119,18.059 20.238,18.178 U2.17@20.238,19.552
SRB1: H9.1 R36.2 | length 5.7
  Top w0.203: H9.1@3.353,6.477 3.581,6.248 R36.2@8.941,6.248
SRB2: C60.2 R64.1 U1.17 | length 17.8
  Top w0.203: R64.1@8.627,40.081 8.78,39.929 C60.2@10.922,39.929 ; C60.2@10.984,40.056 10.984,41.134 11.252,41.402 14.58,41.402 15.951,42.774 15.951,45.669 16.586,46.304 20.276,46.304 20.395,46.423 U1.17@20.395,47.471
START: U1.38 U2.38 U3.33 | length 52.3
  Top w0.203: U2.38@29.553,23.566 35.515,23.566 36.126,22.954 36.713,22.954 v1(36.738,22.979) 36.738,22.901 38.769,20.871 42.299,20.871 U3.33@42.57,20.599 ; U1.38@29.68,52.014 30.461,52.014 30.516,51.959 37.492,51.959 37.838,51.613 v1(37.948,51.613)
  Bottom w0.203: v1(36.738,22.979) 36.703,23.013 36.703,24.028 38.43,25.756 38.43,51.09 37.948,51.572 v1(37.948,51.613)
TXD0: R26.2 U3.37 | length 46.8
  Top w0.203: U3.37@42.977,15.24 43.028,15.291 v1(46.66,15.291) ; v1(83.07,20.278) 83.123,20.278 83.6,19.801 R26.2@83.6,18.948
  Bottom w0.203: v1(46.66,15.291) 46.66,15.195 46.838,15.017 46.838,14.351 47.65,13.538 66.954,13.538 67.716,14.3 67.716,16.205 68.707,17.196 79.988,17.196 v1(83.07,20.278)
USB_D+: D6.2 U3.14 USB2.A6 | length 39.8
  Top w0.203: USB2.A6@33.43,7.526 33.452,7.547 33.452,9.486 36.107,12.141 37.178,12.141 37.335,11.984 37.781,11.984 D6.2@37.9,12.103 ; D6.2@37.949,12.173 37.989,12.173 38.15,12.012 38.191,12.012 38.207,11.997 38.501,11.997 38.793,12.288 39.217,12.288 ; v1(58.268,26.543) 58.378,26.543 58.555,26.365 58.952,26.365 59.071,26.484 59.071,27.066 59.632,27.627 59.693,27.627 60.209,28.142 U3.14@60.509,28.142
  Bottom w0.203: v1(39.495,12.465) 39.528,12.431 40.206,12.431 48.92,21.145 48.92,25.64 49.645,26.365 57.98,26.365 58.158,26.543 v1(58.268,26.543)
USB_D-: D7.2 U3.13 USB2.A7 | length 38.9
  Top w0.203: USB2.A7@33.93,7.526 33.909,7.547 33.909,9.296 36.297,11.684 36.988,11.684 37.145,11.527 37.78,11.527 D7.2@37.899,11.408 ; D7.2@37.947,11.338 37.987,11.338 38.189,11.539 38.691,11.539 38.982,11.831 39.317,11.831 39.489,11.659 v1(39.599,11.659) ; v1(58.268,25.73) 58.378,25.73 58.555,25.908 59.141,25.908 59.528,26.295 59.528,26.449 59.647,26.569 60.205,26.569 U3.13@60.509,26.872
  Bottom w0.203: v1(39.599,11.659) 39.676,11.736 40.158,11.736 49.378,20.956 49.378,25.451 49.835,25.908 57.98,25.908 58.158,25.73 v1(58.268,25.73)
pads on no net: SW3.3 U1.1 U1.3 U1.5 U1.7 U1.9 U1.11 U1.13 U1.15 U1.18 U1.27 U1.29 U1.47 U1.64 U2.1 U2.3 U2.5 U2.7 U2.9 U2.11 U2.13 U2.15 U2.18 U2.27 U2.29 U2.64 U3.8 U3.9 U3.10 U3.11 U3.12 U3.15 U3.16 U3.17 U3.18 U3.19 U3.20 U3.21 U3.22 U3.23 U3.24 U3.25 U3.26 U3.38 U3.39 U7.14 U8.7 U8.8 U8.9 U8.10 U8.11 U8.12 U8.15 U9.1 U9.5 U9.8 U11.4 U11.9 U11.11 USB1.A8 USB1.B6 USB1.B7 USB1.B8 USB2.A4B9 USB2.A8 USB2.B4A9 USB2.B6 USB2.B7 USB2.B8
copper on no net:
  other v1: 52.409,17.952 53.809,17.952 51.709,18.652 53.109,18.652 54.509,18.652 52.409,19.352 53.809,19.352 51.709,20.052 53.109,20.052 54.509,20.052 52.409,20.752 53.809,20.752

## Polygon pours and split planes (outlines as drawn)
PGND2 on Top "PGND2_L01_P055" (solid, pour order 55): 93.218,29.54 90.475,29.54 89.713,30.302 89.713,31.344 85.598,31.344 85.522,31.267 85.522,23.089 87.427,23.089 87.351,23.012 87.351,19.025 85.496,19.025 85.471,18.999 85.471,12.167 93.166,12.167
GND on Top "GND_L01_P054" (solid, pour order 54): 92.558,41.58 92.558,67.462 46.425,67.462 46.425,40.513 43.688,40.513 42.926,39.751 42.951,39.726 42.951,32.334 45.062,30.223 60.302,30.223 60.302,30.076 60.3,30.074 61.697,28.677 64.592,28.677 64.618,28.651 74.778,28.651 79.273,33.147 79.273,37.846 78.384,38.735 75.032,38.735 74.828,38.938 75.057,39.167 75.057,41.58
AGND on Top "AGND_L01_P053" (solid, remove dead copper, pour order 53): 46.431,67.462 0.483,67.462 0.279,67.259 0.33,67.208 0.33,1.295 25.603,1.295 25.959,1.651 25.959,10.973 33.579,10.973 36.017,13.411 36.017,18.898 36.093,18.974 29.667,18.974 26.492,22.149 26.492,31.877 26.797,32.182 26.822,32.156 30.861,32.156 30.861,38.379 30.836,38.405 32.817,40.386 34.341,40.386 34.392,40.437 34.392,45.949 33.807,46.533 27.254,46.533 27.254,60.249 46.406,60.249 46.431,60.274
DGND on Top "DGND_L01_P051" (solid, remove dead copper, pour order 51): 92.583,41.58 92.685,29.558 92.658,29.531 92.649,29.54 90.475,29.54 89.687,30.328 89.687,31.318 85.598,31.318 85.522,31.242 85.522,23.089 87.325,23.089 87.351,23.063 87.351,19.05 85.471,19.05 85.446,19.025 85.471,18.999 85.471,12.192 92.685,12.192 92.71,12.167 92.634,12.09 92.634,1.321 41.453,1.321 41.173,1.6 41.173,7.722 38.633,7.722 38.659,7.747 38.659,8.56 35.738,8.56 35.763,8.534 35.763,6.553 31.699,6.553 31.572,6.68 31.547,6.68 31.547,9.246 25.933,9.246 25.933,11.024 33.68,11.024 36.043,13.386 36.043,18.974 29.642,18.974 26.492,22.123 26.492,31.877 26.772,32.156 30.836,32.156 30.836,38.381 32.816,40.361 34.392,40.361 34.392,45.949 33.807,46.533 27.254,46.533 27.254,60.249 46.457,60.249 46.457,40.513 43.688,40.513 42.951,39.776 42.951,32.334 45.057,30.229 60.316,30.229 60.316,30.057 61.747,28.626 74.778,28.626 79.324,33.172 79.324,37.77 78.334,38.76 75.057,38.76 75.057,41.58 92.405,41.58
PGND1 on Top "PGND1_L01_P050" (solid, pour order 50): 25.933,1.448 25.933,9.246 31.572,9.246 31.572,6.68 31.699,6.553 35.763,6.553 35.763,8.509 35.789,8.534 38.633,8.534 38.633,7.722 41.173,7.722 41.173,1.448 25.883,1.448
AVSS on Top "AVSS_L01_P031" (solid, pour order 31): 55.321,46.228 56.49,46.228 56.769,46.507 56.769,48.285 59.157,48.285 59.157,45.415 55.423,45.415 55.321,45.517
AVDD on Top "Top-AVDD" (solid, pour order 29): 51.46,41.631 52.222,41.631 52.222,41.885 51.181,41.885 51.181,41.478 51.308,41.478
NetR75_1 on Top "NETR75_1_L01_P025" (solid, pour order 25): 51.816,43.637 51.816,45.974 52.248,45.974 52.248,43.637
AVSS on Top "AVSS_L01_P024" (solid, pour order 24): 53.746,43.637 53.746,45.974 54.178,45.974 54.178,43.637
OUT on Top "OUT_L01_P022" (solid, pour order 22): 53.696,42.393 55.093,42.393 55.88,41.605 57.404,41.605 57.404,41.148 55.728,41.148 54.737,42.139 53.696,42.139
DVDD on Top "DVDD_L01_P021" (solid, remove dead copper, pour order 21): 75.794,35.357 78.664,35.357 78.664,32.055 75.794,32.055
DVDD on Top "DVDD_L01_P020" (solid, remove dead copper, pour order 20): 69.393,33.274 69.393,33.985 70.434,33.985 70.714,34.265 70.714,35.357 76.632,35.357 76.632,34.62 71.45,34.62 71.298,34.468 71.298,33.96 70.612,33.274 70.053,33.274
OUT on Top "OUT_L01_P017" (solid, remove dead copper, pour order 17): 67.183,33.96 67.158,33.985 65.659,33.985 65.253,34.392 64.211,34.392 64.211,33.68 64.313,33.579 65.278,33.579 65.608,33.249 67.183,33.249 65.608,33.249 67.183,33.249
OUT on Top "OUT_L01_P016" (solid, pour order 16): 68.58,44.12 68.58,43.332 67.691,43.332 66.269,41.91 64.211,41.91 64.211,42.672 65.684,42.672 65.989,42.672 67.437,44.12 68.478,44.12
+BATT on Top "+BATT_L01_P014" (solid, pour order 14): 73.584,44.348 73.609,44.374 75.717,44.374 79.375,44.374 79.375,43.586 75.59,43.586 73.584,43.586
+BATT on Top "+BATT_L01_P015" (solid, remove dead copper, pour order 15): 70.917,44.145 71.704,44.145 71.933,44.374 73.812,44.374 73.812,43.713 73.711,43.612 71.958,43.612 71.704,43.866 70.891,43.866
+V_USB on Top "+V_USB_L01_P013" (solid, remove dead copper, pour order 13): 68.25,42.507 68.25,39.484 69.012,39.484 69.012,42.507
+V_USB on Top "+V_USB_L01_P012" (solid, remove dead copper, pour order 12): 68.199,40.234 68.199,37.389 70.231,37.389 70.231,38.887 69.113,38.887 68.961,39.04 68.961,40.234
+V_USB on Top "+V_USB_L01_P010" (solid, remove dead copper, pour order 10): 82.931,28.931 82.931,30.632 78.969,30.632 78.969,28.931
+V_USB on Top "+V_USB_L01_P009" (solid, remove dead copper, pour order 9): 81.483,26.695 83.185,26.695 83.185,30.658 81.483,30.658
+V_USB on Top "+V_USB_L01_P005" (solid, remove dead copper, pour order 5): 87.078,23.647 84.303,23.647 84.303,22.047 85.344,22.047 85.344,23.19 87.078,23.19
+V_USB on Top "+V_USB_L01_P004" (solid, remove dead copper, pour order 4): 87.046,18.364 84.404,18.364 84.404,20.041 85.369,20.041 85.369,18.821 87.046,18.821
+BATT_IN on Top "+BATT_IN_L01_P002" (solid, pour order 2): 84.379,55.499 84.379,42.215 86.665,42.215 86.665,55.533
NetH4_1 on Top "NETH4_1_L01_P001" (solid, pour order 1): 79.629,63.615 79.629,52.629 82.169,52.629 82.169,63.587
AVDD on POWER "AVDD_L03_P049" (solid, pour order 49): 24.232,67.361 19.71,67.361 19.71,1.575 24.232,1.575
AVSS on POWER "AVSS_L03_P041" (solid, pour order 41): 50.698,45.39 50.698,67.386 24.867,67.386 24.867,1.676 28.905,1.676 28.905,63.83 44.348,63.83 46.736,61.443 46.736,45.39
DVDD on POWER "DVDD_L03_P047" (solid, pour order 47): 51.333,67.513 92.532,67.513 92.532,1.6 92.507,1.575 92.456,1.626 29.743,1.626 29.743,63.043 45.72,63.043 45.72,44.958 59.665,44.958 59.665,48.666 51.333,48.666
AVSS on POWER "AVSS_L03_P039" (solid, pour order 39): 59.131,48.311 50.698,48.311 50.698,45.39 59.157,45.39
+V_USB on POWER "+V_USB_L03_P011" (solid, pour order 11): 80.899,28.931 81.051,29.083 81.051,34.036 79.121,35.966 79.121,38.887 68.224,38.887 68.224,37.338 76.835,37.338 77.546,36.627 77.546,34.9 78.918,33.528 78.918,28.956 78.943,28.931
+V_USB on POWER "POWER-+V_USB" (solid, pour order 8): 83.795,18.39 85.319,18.39 85.319,23.647 85.319,26.441 84.633,27.127 83.16,27.127 83.16,28.219 81.432,28.219 81.432,26.695 82.245,25.883 83.795,25.883
AVSS on Bottom "AVSS_L04_P030" (solid, pour order 30): 56.769,46.507 56.769,48.26 59.157,48.26 59.157,45.415 56.769,45.415
AGND on GND "AGND_L02_P038" (solid, pour order 38): 46.431,67.462 0.483,67.462 0.279,67.259 0.33,67.208 0.33,1.295 25.603,1.295 25.959,1.651 25.959,10.973 33.579,10.973 36.017,13.411 36.017,18.898 36.093,18.974 29.667,18.974 26.492,22.149 26.492,31.877 26.797,32.182 26.822,32.156 30.861,32.156 30.861,38.379 30.836,38.405 32.817,40.386 34.341,40.386 34.392,40.437 34.392,45.949 33.807,46.533 27.254,46.533 27.254,60.249 46.406,60.249 46.431,60.274
GND on GND "GND_L02_P037" (solid, remove dead copper, pour order 37): 92.558,41.58 92.558,67.462 46.425,67.462 46.425,40.513 43.688,40.513 42.926,39.751 42.951,39.726 42.951,32.334 45.062,30.223 60.302,30.223 60.302,30.076 60.3,30.074 61.697,28.677 64.592,28.677 64.618,28.651 74.778,28.651 79.273,33.147 79.273,37.846 78.384,38.735 75.032,38.735 74.828,38.938 75.057,39.167 75.057,41.58
DGND on GND "DGND_L02_P036" (solid, pour order 36): 92.583,41.58 92.685,29.558 92.658,29.531 92.649,29.54 90.475,29.54 89.687,30.328 89.687,31.318 85.598,31.318 85.522,31.242 85.522,23.089 87.325,23.089 87.351,23.063 87.351,19.05 85.471,19.05 85.446,19.025 85.471,18.999 85.471,12.192 92.685,12.192 92.71,12.167 92.634,12.09 92.634,1.321 41.453,1.321 41.173,1.6 41.173,7.722 38.633,7.722 38.659,7.747 38.659,8.56 35.738,8.56 35.763,8.534 35.763,6.553 31.699,6.553 31.572,6.68 31.547,6.68 31.547,9.246 25.933,9.246 25.933,11.024 33.68,11.024 36.043,13.386 36.043,18.974 29.642,18.974 26.492,22.123 26.492,31.877 26.772,32.156 30.836,32.156 30.836,38.381 32.816,40.361 34.392,40.361 34.392,45.949 33.807,46.533 27.254,46.533 27.254,60.249 46.457,60.249 46.457,40.513 43.688,40.513 42.951,39.776 42.951,32.334 45.057,30.229 60.316,30.229 60.316,30.057 61.747,28.626 74.778,28.626 79.324,33.172 79.324,37.77 78.334,38.76 75.057,38.76 75.057,41.58 92.405,41.58
PGND1 on GND "PGND1_L02_P035" (solid, pour order 35): 25.933,1.448 25.933,9.246 31.572,9.246 31.572,6.68 31.699,6.553 35.763,6.553 35.763,8.509 35.789,8.534 38.633,8.534 38.633,7.722 41.173,7.722 41.173,1.448 25.883,1.448
PGND2 on GND "PGND2_L02_P033" (solid, pour order 33): 93.218,29.54 90.475,29.54 89.713,30.302 89.713,31.344 85.598,31.344 85.522,31.267 85.522,23.089 87.427,23.089 87.351,23.012 87.351,19.025 85.496,19.025 85.471,18.999 85.471,12.167 93.166,12.167

## Other copper
Top:
  pour cut-out: 41.605,1.168 41.554,1.219 41.554,9.296 61.849,9.296 61.849,1.118
GND:
  pour cut-out: 41.554,9.373 41.58,9.398 61.849,9.398 61.849,1.118 41.605,1.118 41.554,1.168
POWER:
  pour cut-out: 41.554,9.373 41.58,9.398 61.849,9.398 61.849,1.118 41.605,1.118 41.554,1.168

## Silkscreen, mask and mechanical layers (free items; w line width, h text height)
Mechanical 1:
  lines w0.203: 0,0.016 0,70.002 93.015,70.002 93.015,0.012 ; 0,0.025 93,0.025

## Text inside footprints (layer, text, board x,y; h text height)
SW1: Top Overlay "C29" at 71.935,57.996 h1.1; Top Overlay "C29" at 74.663,53.183 h1.1; Top Overlay "C29" at 72.089,53.173 h1.1